# Altium PCB main.PcbDoc (part 1 of 2)
Units mm, origin at the board's own origin, x right, y up, seen from the top; angles counter-clockwise.
Board outline 183.51 x 49.02 mm, 2 copper layers (Top Layer, Bottom Layer); 89 components, 67 nets, 308 pads, 66 vias.
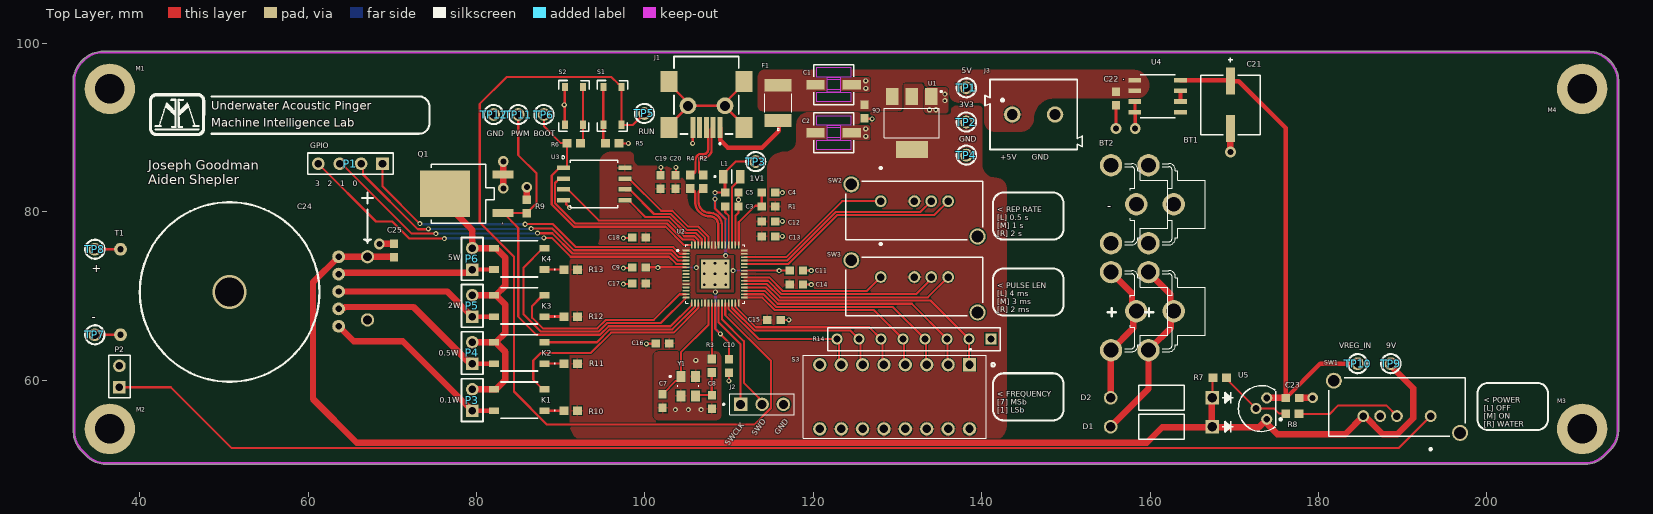
[diagram p0: Top Layer view]
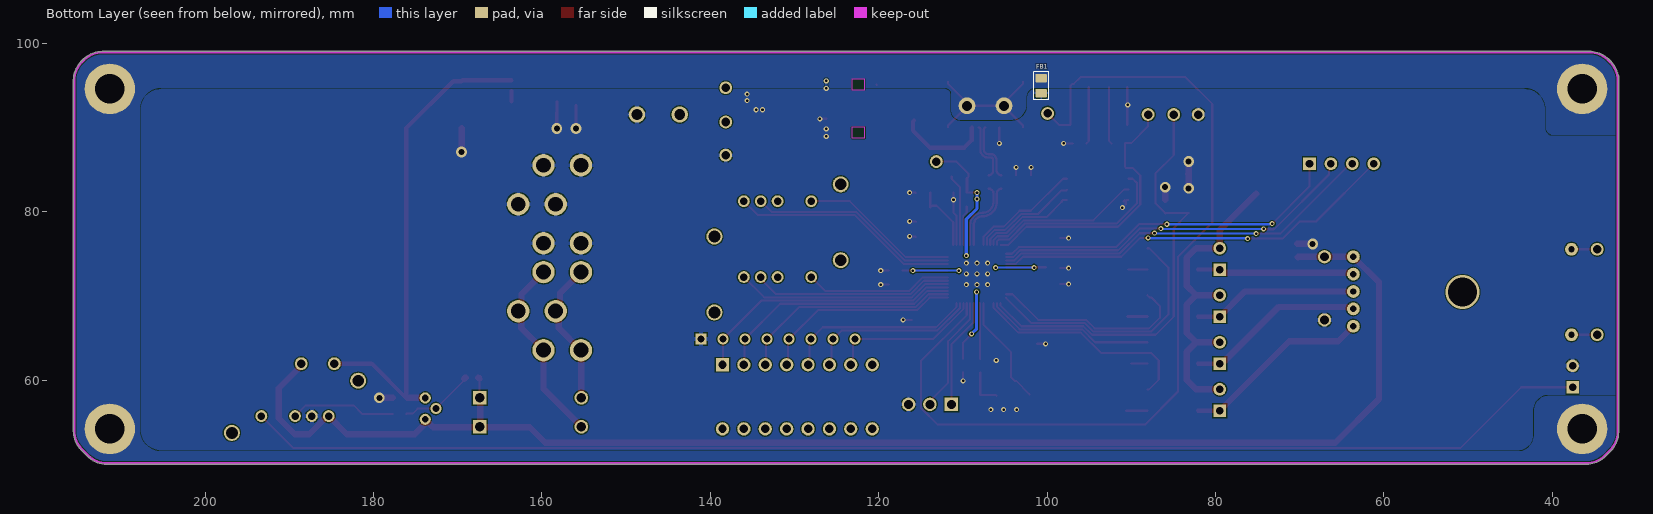
[diagram p1: Bottom Layer view, seen from below]

## Layer stack, top to bottom
Top Solder: solder mask 0.0102, Solder Resist, Dk 3.5
Top Layer: signal copper 0.0356
Dielectric 1: dielectric 0.32, FR-4, Dk 4.8
Bottom Layer: signal copper 0.0356
Bottom Solder: solder mask 0.0102, Solder Resist, Dk 3.5

## Board outline
33.067,51.591 cw(c35.324,53.848) 32.133,53.848 32.133,96.139 cw(c32.258,96.139) 32.192,96.246 cw(c35.324,95.631) 33.067,97.888 33.068,97.888 33.303,98.123 33.303,98.124 cw(c35.56,95.867) 35.402,99.054 35.433,99.058 35.562,99.058 212.217,99.058 cw(c212.217,95.867) 214.474,98.124 214.71,97.888 cw(c212.453,95.631) 215.644,95.631 215.644,95.63 215.644,53.975 cw(c212.453,53.975) 214.71,51.718 213.966,50.974 cw(c211.709,53.231) 211.709,50.04 35.941,50.04 cw(c35.941,53.231) 33.684,50.974

## Design rules (kind name [scope] priority, off if disabled: settings)
Clearance [All] p1: gap=0.125 ignorepadtopadclearanceinfootprint=FALSE
ComponentClearance ComponentClearance_1 [InComponent('C24')] p1: gap=-0.025 collisioncheckmode=3 verticalgap=-0.025 showdistances=FALSE
ComponentClearance [All] p2: gap=0.254 collisioncheckmode=3 verticalgap=0.254 showdistances=FALSE
DiffPairsRouting DiffPairsRouting_USB [InDifferentialPair('D')] p1: maxlimit=0.127 minlimit=0.127 mostfreqgap=0.127 toplayer_minwidth=0.277 toplayer_maxwidth=0.277 toplayer_prefwidth=0.277 bottomlayer_minwidth=0.277 bottomlayer_maxwidth=0.277 bottomlayer_prefwidth=0.277 impedanceprofiledriven=TRUE impedanceprofileid={1446AEBD-7155-41AE-8382-F6E25852DD7B} impedanceprofilevalue=90.000000 maxuncoupledlength=12.7
DiffPairsRouting DiffPairsRouting_USB_X [InDifferentialPair('DX')] p2: maxlimit=0.127 minlimit=0.127 mostfreqgap=0.127 toplayer_minwidth=0.277 toplayer_maxwidth=0.277 toplayer_prefwidth=0.277 bottomlayer_minwidth=0.277 bottomlayer_maxwidth=0.277 bottomlayer_prefwidth=0.277 impedanceprofiledriven=TRUE impedanceprofileid={1446AEBD-7155-41AE-8382-F6E25852DD7B} impedanceprofilevalue=90.000000 maxuncoupledlength=12.7
DiffPairsRouting DiffPairsRouting_RS485 [InDifferentialPair('RS485')] p3: maxlimit=0.305 minlimit=0.127 mostfreqgap=0.254 toplayer_minwidth=0.099 toplayer_maxwidth=0.205 toplayer_prefwidth=0.205 bottomlayer_minwidth=0.099 bottomlayer_maxwidth=0.205 bottomlayer_prefwidth=0.205 maxuncoupledlength=12.7
DiffPairsRouting DiffPairsRouting_RS485_X [InDifferentialPair('RS485X')] p4: maxlimit=0.305 minlimit=0.127 mostfreqgap=0.254 toplayer_minwidth=0.099 toplayer_maxwidth=0.205 toplayer_prefwidth=0.205 bottomlayer_minwidth=0.099 bottomlayer_maxwidth=0.205 bottomlayer_prefwidth=0.205 maxuncoupledlength=12.7
Height [All] p1: minheight=0 maxheight=50.8 prefheight=12.7
HoleSize [All] p1: absolutevalues=TRUE maxlimit=5.08 minlimit=0.025 maxpercent=80.000 minpercent=20.000
MinimumSolderMaskSliver [All] p1: minsoldermaskwidth=0.102
PolygonConnect Polygon_Cap_GND [IsNamedPolygon('T.5V') or IsNamedPolygon('T.5V') or IsNamedPolygon('T.GND-2')] p1: thpad.connectstyle=Relief thpad.reliefconductorwidth=0.254 thpad.reliefentries=4 thpad.polygonreliefangle="90 Angle" thpad.airgapwidth=0.125 smdpad.connectstyle=Direct smdpad.reliefconductorwidth=0.254 smdpad.reliefentries=4 smdpad.polygonreliefangle="90 Angle" smdpad.airgapwidth=0.125 via.connectstyle=Direct via.reliefconductorwidth=0.254 via.reliefentries=4 via.polygonreliefangle="90 Angle" via.airgapwidth=0.125
PolygonConnect Polygon_GND_Connect [IsNamedPolygon('B.GND')] p2: thpad.connectstyle=Relief thpad.reliefconductorwidth=0.508 thpad.reliefentries=4 thpad.polygonreliefangle="90 Angle" thpad.airgapwidth=0.125 smdpad.connectstyle=Relief smdpad.reliefconductorwidth=0.254 smdpad.reliefentries=4 smdpad.polygonreliefangle="90 Angle" smdpad.airgapwidth=0.125 via.connectstyle=Direct via.reliefconductorwidth=0.254 via.reliefentries=4 via.polygonreliefangle="90 Angle" via.airgapwidth=0.125
PolygonConnect Polygon_3V3-2/GND-12/1V1-1_Connect_Relief90 [IsNamedPolygon('T.1V1-1') or IsNamedPolygon('T.GND-1') or IsNamedPolygon('B.GND-1') or IsNamedPolygon('T.5V') vs (IsThruPin or IsSMTPin or IsPad or IsComponentPad or IsVia)] p3: thpad.connectstyle=Relief thpad.reliefconductorwidth=0.254 thpad.reliefentries=4 thpad.polygonreliefangle="90 Angle" thpad.airgapwidth=0.125 smdpad.connectstyle=Relief smdpad.reliefconductorwidth=0.254 smdpad.reliefentries=4 smdpad.polygonreliefangle="90 Angle" smdpad.airgapwidth=0.125 via.connectstyle=Direct via.reliefconductorwidth=0.254 via.reliefentries=4 via.polygonreliefangle="90 Angle" via.airgapwidth=0.125
PolygonConnect Polygon_5V [IsNamedPolygon('T.5V') vs (IsThruPin or IsSMTPin or IsPad or IsComponentPad or IsVia)] p4: thpad.connectstyle=Relief thpad.reliefconductorwidth=0.508 thpad.reliefentries=4 thpad.polygonreliefangle="90 Angle" thpad.airgapwidth=0.125 smdpad.connectstyle=Relief smdpad.reliefconductorwidth=0.508 smdpad.reliefentries=4 smdpad.polygonreliefangle="90 Angle" smdpad.airgapwidth=0.125 via.connectstyle=Direct via.reliefconductorwidth=0.254 via.reliefentries=4 via.polygonreliefangle="90 Angle" via.airgapwidth=0.125
PolygonConnect Polygon_3V3-3_Connect [IsNamedPolygon('T.3V3-3') vs (IsThruPin or IsSMTPin or IsPad or IsComponentPad or IsVia)] p5: thpad.connectstyle=Relief thpad.reliefconductorwidth=0.254 thpad.reliefentries=4 thpad.polygonreliefangle="90 Angle" thpad.airgapwidth=0.125 smdpad.connectstyle=Relief smdpad.reliefconductorwidth=0.254 smdpad.reliefentries=4 smdpad.polygonreliefangle="90 Angle" smdpad.airgapwidth=0.125 via.connectstyle=Direct via.reliefconductorwidth=0.254 via.reliefentries=4 via.polygonreliefangle="90 Angle" via.airgapwidth=0.125
PolygonConnect Polygon_3V3-1_Connect_Direct [IsNamedPolygon('T.3V3-1')] p6: connectstyle=Direct reliefconductorwidth=0.254 reliefentries=4 polygonreliefangle="90 Angle" airgapwidth=0.254
PolygonConnect Polygon_3V3-2_Connect [IsNamedPolygon('T.5V')] p7: thpad.connectstyle=Relief thpad.reliefconductorwidth=0.254 thpad.reliefentries=4 thpad.polygonreliefangle="90 Angle" thpad.airgapwidth=0.254 smdpad.connectstyle=Relief smdpad.reliefconductorwidth=0.254 smdpad.reliefentries=4 smdpad.polygonreliefangle="90 Angle" smdpad.airgapwidth=0.254 via.connectstyle=Direct via.reliefconductorwidth=0.254 via.reliefentries=4 via.polygonreliefangle="90 Angle" via.airgapwidth=0.254
PolygonConnect PolygonConnect_1V1 [IsNamedPolygon('T.1V1-1')] p8: connectstyle=Direct reliefconductorwidth=0.254 reliefentries=4 polygonreliefangle="90 Angle" airgapwidth=0.254
PolygonConnect Polygon_EARTH_Direct_Connect [IsNamedPolygon('B.EARTH')] p9: connectstyle=Direct reliefconductorwidth=0.508 reliefentries=4 polygonreliefangle="90 Angle" airgapwidth=0.254
PolygonConnect [All] p10: connectstyle=Relief reliefconductorwidth=0.254 reliefentries=4 polygonreliefangle="90 Angle" airgapwidth=0.254
RoutingVias [All] p1: holewidth=0.711 width=1.27 viastyle="Through Hole" minholewidth=0.15 minwidth=0.4 maxholewidth=0.711 maxwidth=1.27
SolderMaskExpansion [All] p1: expansion=0.102 istentingtop=FALSE
SupplyNets "Schematic Supply Nets_6" [InNet('9V')] p1: voltage=0.000
SupplyNets "Schematic Supply Nets_5" [InNet('EARTH')] p2: voltage=0.000
SupplyNets "Schematic Supply Nets_3" [InNet('1V1')] p3: voltage=0.000
SupplyNets "Schematic Supply Nets_2" [InNet('3V3')] p4: voltage=0.000
SupplyNets "Schematic Supply Nets_1" [InNet('GND')] p5: voltage=0.000
SupplyNets "Schematic Supply Nets" [InNet('5V')] p6: voltage=0.000
Width [All] p1: maxlimit=2.54 minlimit=0.2 preferedwidth=0.254
25 further rules are at their usual default settings.

## Classes and differential pairs
component class waveform-output: BT1 BT2 C21 C22 C23 C24 C25 D1 D2 J3 K1 K2 K3 K4 P2 P3 P4 P5 P6 Q1 R7 R8 R9 R10 R11 R12 R13 R14 S3 SW1 SW2 SW3 T1 TP7 TP8 TP9 TP10 TP11 TP12 U4 U5
component class rp2350: B C1 C2 C3 C4 C5 C6 C7 C8 C9 C10 C11 C12 C13 C14 C15 C16 C17 C18 C19 C20 F1 FB1 J1 J2 L1 M1 M2 M3 M4 P1 R1 R2 R3 R4 R5 R6 S1 S2 TP1 TP2 TP3 TP4 TP5 TP6 U1 U2 U3 Y1
differential pair DX: +DX_P -DX_N
differential pair D: +D_P -D_N

## Components (designator, comment, footprint, x,y, rotation, side; value= is the part's Value field where it differs from the comment)
BT1 "593_594" BAT_593 162.814,68.212 r90 top
BT2 "593_594" BAT_593 158.369,68.212 r90 top
C1 "10uF" RADIAL_CAN_CAP_4_X_5.8_SMD 122.428,95.123 r0 top
C2 "10uF" RADIAL_CAN_CAP_4_X_5.8_SMD 122.428,89.408 r0 top
C3 "Cap" CAPC0603 110.325,80.645 r0 top value=4.7uF
C4 "Cap" CAPC0603 114.681,82.296 r0 top value=4.7uF
C5 "Cap" CAPC0603 110.325,82.296 r0 top value=4.7uF
C6 "Cap" CAPC0603 126.111,91.948 r90 top value=100nF
C7 "Cap" CAPC0603 102.108,57.531 r270 top value=15pF
C8 "Cap" CAPC0603 107.95,57.442 r270 top value=15pF
C9 "Cap" CAPC0603 99.314,73.406 r180 top value=100nF
C10 "Cap" CAPC0603 109.982,61.722 r270 top value=4.7uF
C11 "Cap" CAPC0603 117.983,73.025 r0 top value=100nF
C12 "Cap" CAPC0603 114.681,78.867 r0 top value=100nF
C13 "Cap" CAPC0603 114.681,77.089 r0 top value=100nF
C14 "Cap" CAPC0603 117.983,71.374 r0 top value=100nF
C15 "Cap" CAPC0603 115.316,67.183 r0 top value=100nF
C16 "Cap" CAPC0603 102.108,64.389 r180 top value=100nF
C17 "Cap" CAPC0603 99.314,71.501 r180 top value=100nF
C18 "Cap" CAPC0603 99.314,76.962 r180 top value=100nF
C19 "Cap" CAPC0603 101.854,83.566 r90 top value=100nF
C20 "Cap" CAPC0603 103.632,83.566 r90 top value=100nF
C21 "100uF" CAP_SMT_RADIAL_W6.6MM_D6.3MM 169.545,92.723 r270 top
C22 "Tantalum" CAPC0603 155.956,93.472 r90 top value=10uF
C23 "Cap" CAPC0603 176.911,57.912 r0 top value=100nF
C24 "6800uF" CAP_TH_RADIAL_W18MM_D7.5MM 67.056,74.676 r270 top
C25 "Cap" CAPC0603 70.231,75.438 r90 top value=100nF
D1 "1N4003" CR_1N4005_ONS 167.401,54.483 r180 top
D2 "1N4003" CR_1N4005_ONS 167.401,57.925 r180 top
F1 "MF-MSMF050-2" FUSM4632X85 115.824,92.964 r90 top
FB1 "0805" L0805 100.711,94.996 r270 bottom
J1 "[USB]Mini-B-USB" SAMTEC_MUSB-05-X-B-SM-A-R-K-TR 107.315,93.853 r180 top
J2 "[Connector] 1x3-header-2.54mm pitch" 1x3-2.54MM-MALE-HEADER 113.919,57.15 r0 top
J3 "[Connector] 691213510002" "[CONNECTOR] 5MM_2PORT_SCREW" 146.177,91.567 r0 top
K1 "AQY282SZ" AQY282SZ 85.09,57.658 r90 top
K2 "AQY282SZ" AQY282SZ 85.09,63.246 r90 top
K3 "AQY282SZ" AQY282SZ 85.09,68.834 r90 top
K4 "AQY282SZ" AQY282SZ 85.09,74.422 r90 top
L1 "3.3uH" 2016_SMD_Inductor 110.325,84.201 r0 top
M1 "M3 Mount Hole" 3.5MM-MOUNTING-HOLE 36.449,94.615 r0 top
M2 "M3 Mount Hole" 3.5MM-MOUNTING-HOLE 36.449,54.229 r0 top
M3 "M3 Mount Hole" 3.5MM-MOUNTING-HOLE 211.328,54.229 r0 top
M4 "M3 Mount Hole" 3.5MM-MOUNTING-HOLE 211.328,94.615 r0 top
P1 "Header 4" HDR1X4 68.834,85.725 r180 top
P2 "water detector" HDR1X2 37.592,59.182 r90 top
P3 "0.1W" HDR1X2 79.502,56.388 r90 top
P4 "0.5W" HDR1X2 79.502,61.976 r90 top
P5 "2W" HDR1X2 79.502,67.564 r90 top
P6 "5W" HDR1X2 79.502,73.152 r90 top
Q1 "NMOS" TO-252AA 77.851,82.169 r90 top
R1 "Res" RES0603 114.681,80.645 r180 top value=33
R2 "Res" RES0603 106.934,83.566 r270 top value=27
R3 "Res" RES0603 107.95,61.722 r90 top value=1k
R4 "Res" RES0603 105.41,83.566 r270 top value=27
R5 "Res" RES0603 96.139,88.138 r180 top value=1k
R6 "Res" RES0603 91.567,88.138 r180 top value=1k
R7 "Res" RES0603 168.275,60.325 r180 top value=10Meg
R8 "Res" RES0603 176.911,56.007 r0 top value=10k
R9 "Res" RES0603 85.979,80.645 r90 top value=1Meg
R10 "Res" RES0603 91.186,56.388 r0 top value=330
R11 "Res" RES0603 91.186,61.976 r0 top value=330
R12 "Res" RES0603 91.186,67.564 r0 top value=330
R13 "Res" RES0603 91.186,73.152 r0 top value=330
R14 "4608X-101-105LF" BO_4608X 141.122,64.897 r180 top
S1 "[SPST] SMD Pushbutton" "[SPST] SMD Pushbutton" 96.139,92.583 r90 top
S2 "[SPST] SMD Pushbutton" "[SPST] SMD Pushbutton" 91.567,92.583 r90 top
S3 "DS01C-254-L-08BE" SW_DS01C-254-L-08BE 129.667,58.039 r180 top
SW1 "1825255-8" MHS-133_TEC 193.325,55.753 r270 top
SW2 "1825255-8" MHS-133_TEC 128.016,81.28 r90 top
SW3 "1825255-8" MHS-133_TEC 128.016,72.263 r90 top
T1 "multi_tap_transformer" multi_tap_transformer 50.673,70.485 r270 top
TP1 "TP" TPTH-100mil 138.176,94.742 r0 top
TP2 "TP" TPTH-100mil 138.176,90.678 r0 top
TP3 "TP" TPTH-100mil 113.157,85.979 r0 top
TP4 "TP" TPTH-100mil 138.176,86.741 r0 top
TP5 "TP" TPTH-100mil 99.949,91.694 r0 top
TP6 "TP" TPTH-100mil 88.011,91.567 r0 top
TP7 "TP" TPTH-100mil 34.671,65.405 r0 top
TP8 "TP" TPTH-100mil 34.671,75.565 r0 top
TP9 "TP" TPTH-100mil 188.595,61.976 r0 top
TP10 "TP" TPTH-100mil 184.658,61.976 r90 top
TP11 "TP" TPTH-100mil 84.963,91.567 r90 top
TP12 "TP" TPTH-100mil 82.042,91.567 r90 top
U1 "NCP1117LPST33T3G" SOT230P700X175-4N 131.699,90.551 r270 top
U2 "[MCU] RP2350" QFN40P700X700X90-61N 108.352,72.625 r0 top
U3 "W25Q128JVSIQ TR" SOIC-8-W-208MIL-2 93.98,83.312 r0 top
U4 "LP2951ACDR2G" SOIC8-3.9MM 160.909,93.739 r0 top
U5 "PMOS" TO-92 173.863,55.372 r90 top
Y1 "ABM8-272-T3" XTAL_ABM8-272-T3 105.156,59.309 r0 top

## Footprints (in the part's own frame and the unit in brackets; to place one, negate y for a bottom-side part, rotate by r counter-clockwise, add the part's x,y. Pads: shape width x height; smd on the part's side, far side on the other; paste and mask are expansions set on the pad)
1x3-2.54MM-MALE-HEADER [mm]
  rect 1.605x1.605 hole 1.07: 1(-2.54,0)
  round 1.605 hole 1.07: 2(0,0) 3(2.54,0)
  silkscreen extent -4.66,-1.25 3.81,1.25, body extent -3.81,-1.25 3.81,1.25, height 8.95
3.5MM-MOUNTING-HOLE [mm]
  round 6 hole 3.5: 1(0,0)
2016_SMD_Inductor [mm] "0806 (2016 Metric)"
  rect 1x1.6 smd: 1(-1,0) 2(1,0)
  silkscreen extent -2.1,-0.8 0,0.8, body extent -1,-0.8 1,0.8, height 0.95
"[CONNECTOR] 5MM_2PORT_SCREW" [mm] "5.08 mm pitch 2 port screw terminal / 691213510002"
  round 1.95 hole 1.3: 1(-2.54,0) 2(2.54,0)
  silkscreen extent -5.78,-4.15 5.78,4.15, body extent -5.68,-4.04 5.68,4.06, height 10
"[SPST] SMD Pushbutton" [mm] "PTS815SJM250SMTRLFS"
  rect 1x0.7 smd: 1(-2.25,1.075) 1(2.25,1.075) 2(-2.25,-1.075) 2(2.25,-1.075)
  silkscreen extent -3.02,-1.82 3.02,1.8, body extent -2.25,-1.6 2.25,1.6, height 2.5
AQY282SZ [mm]
  rect 0.8x1.2 smd: 1(-1.27,-3) 2(1.27,-3) 3(1.27,3) 4(-1.27,3)
  silkscreen extent -2.15,-4.25 2.15,2.2, body extent -2.35,-3.4 2.35,3.4, height 1.7
BAT_593 [mm]
  round 2.655 hole 1.77: 1(-4.635,3) 1(0,0) 1(4.635,3) 2(8.065,3) 2(12.7,0) 2(17.335,3)
  silkscreen extent -4.83,-3.75 17.52,3.43, body extent -4.7,-3.56 17.65,3.96, height 14.2
BO_4608X [mil]
  rect 52x52 hole 32 paste-99999 mask+0: 1(0,0)
  round 52 hole 32 paste-99999 mask+0: 2(103,0) 3(206,0) 4(309,0) 5(412,0) 6(515,0) 7(618,0) 8(721,0)
  silkscreen extent -44,-54 764,54, body extent -39,-49 759,49, height 200
CAP_SMT_RADIAL_W6.6MM_D6.3MM [mil]
  rect 126x42 smd paste+0 mask+0: 1(-110.5,0) 2(110.5,0)
  silkscreen extent -220,-139 139,139, body extent -154,-134 154,134, height 317
CAP_TH_RADIAL_W18MM_D7.5MM [mil]
  round 62 hole 42 paste-99999 mask+0: 1(0,0) 2(295.28,0)
  silkscreen extent -302,-25 -252,25, body extent -207,-354 503,354, height 1458
CAPC0603 [mm] "Chip Capacitor, 2-Leads, Body 1.60x0.80mm, IPC Medium Density"
  rect 1x0.95 smd: 1(-0.8,0) 2(0.8,0)
  body extent -0.88,-0.48 0.87,0.48, height 0.8
CR_1N4005_ONS [mil]
  rect 64x64 / inner round 60 / far side rect 64x64 hole 44 paste-99999 mask+0: 1(0,0)
  round 64 / inner round 60 / far side round 64 hole 44 paste-99999 mask+0: 2(475.59,0)
  silkscreen extent -97,-58 345,59, body extent -17,-53 493,53, height 107
FUSM4632X85 [mm]
  rect 1.5x3.2 smd: 1(-2.1,0) 2(2.1,0)
  silkscreen extent -3.3,-1.6 1.1,1.6, body extent -2.27,-1.62 2.27,1.62, height 1.1
HDR1X2 [mm] "Connector; Header; 2 Position"
  rect 1.5x1.5 hole 0.9: 1(0,0)
  round 1.5 hole 0.9: 2(2.54,0)
  silkscreen extent -1.27,-1.27 3.81,1.27
HDR1X4 [mm] "Connector; Header; 4 Position"
  rect 1.5x1.5 hole 0.9: 1(0,0)
  round 1.5 hole 0.9: 2(2.54,0) 3(5.08,0) 4(7.62,0)
  silkscreen extent -1.27,-1.27 8.89,1.27
L0805 [mil]
  rrect25% 40x55 smd: 1(-35,0) 2(35,0)
  silkscreen extent -65,-35 65,35, body extent -39,-24 39,24, height 43
MHS-133_TEC [mil]
  round 55 / inner round 60 / far side round 55 hole 35 paste-99999 mask+0: 1(0,0) 2(0,-157.48) 3(0,-236.22) 4(0,-314.96)
  round 75 / inner round 60 / far side round 75 hole 55 paste-99999 mask+0: 5(-165.35,-452.76) 6(78.74,137.8)
  silkscreen extent -180,-477 160,163, body extent -175,-475 89,155, height 694
multi_tap_transformer [mil]
  round 60 hole 30: 1(-165,510) 2(-83.75,510) 3(-2.5,510) 4(78.75,510) 5(160,510) 6(-200,-510) 7(200,-510)
QFN40P700X700X90-61N [mm] "RP2350"
  rrect25% 0.81x0.2 smd paste+0 mask+0.102: 1(-3.45,2.8) 2(-3.45,2.4) 3(-3.45,2) 4(-3.45,1.6) 5(-3.45,1.2) 6(-3.45,0.8) 7(-3.45,0.4) 8(-3.45,0) 9(-3.45,-0.4) 10(-3.45,-0.8) 11(-3.45,-1.2) 12(-3.45,-1.6) 13(-3.45,-2) 14(-3.45,-2.4) 15(-3.45,-2.8) 31(3.45,-2.8) 32(3.45,-2.4) 33(3.45,-2) 34(3.45,-1.6) 35(3.45,-1.2) 36(3.45,-0.8) 37(3.45,-0.4) 38(3.45,0) 39(3.45,0.4) 40(3.45,0.8) 41(3.45,1.2) 42(3.45,1.6) 43(3.45,2) 44(3.45,2.4) 45(3.45,2.8)
  rrect25% 0.2x0.81 smd paste+0 mask+0.102: 16(-2.8,-3.45) 17(-2.4,-3.45) 18(-2,-3.45) 19(-1.6,-3.45) 20(-1.2,-3.45) 21(-0.8,-3.45) 22(-0.4,-3.45) 23(0,-3.45) 24(0.4,-3.45) 25(0.8,-3.45) 26(1.2,-3.45) 27(1.6,-3.45) 28(2,-3.45) 29(2.4,-3.45) 30(2.8,-3.45) 46(2.8,3.45) 47(2.4,3.45) 48(2,3.45) 49(1.6,3.45) 50(1.2,3.45) 51(0.8,3.45) 52(0.4,3.45) 53(0,3.45) 54(-0.4,3.45) 55(-0.8,3.45) 56(-1.2,3.45) 57(-1.6,3.45) 58(-2,3.45) 59(-2.4,3.45) 60(-2.8,3.45)
  rect 3.4x3.4 smd paste-0.62 mask+0.102: 61(0,0)
  silkscreen extent -4.56,-3.5 3.5,3.5, body extent -3.55,-3.55 3.55,3.55, height 0.96
RADIAL_CAN_CAP_4_X_5.8_SMD [mil]
  rect 86x45 smd paste+0 mask+0: 1(-85,0) 2(85,0)
  Top Layer keep-out region: -80,35 -80,80 80,80 80,35
  Top Layer keep-out region: -80,-80 -80,-35 80,-35 80,-80
  Top Layer keep-out region: -30,-35 -30,35 30,35 30,-35
  Keep-Out Layer region: -30,-24.5 -30,24.5 30,24.5 30,-24.5
  silkscreen extent -94,-94 94,94, body extent -108,-89 108,89, height 242
RES0603 [mm] "Chip Resistor, 2-Leads, Body 1.60x0.80mm, IPC Medium Density"
  rect 1.05x1 smd: 1(-0.8,0) 2(0.8,0)
  body extent -0.88,-0.48 0.87,0.47, height 0.8
SAMTEC_MUSB-05-X-B-SM-A-R-K-TR [mm]
  rect 0.6x2.5 smd: 1(-1.6,3.83) 2(-0.8,3.83) 3(0,3.83) 4(0.8,3.83) 5(1.6,3.83)
  rect 2x2.5 smd: SH(-4.45,3.83) SH(-4.45,-1.62) SH(4.45,3.83) SH(4.45,-1.62)
  round 2 hole 1.2: SH(-2.2,1.25) SH(2.2,1.25)
  silkscreen extent -3.85,-4.6 3.85,5.85, body extent -5,-4.6 5,4.9, height 4.13
SOIC8-3.9MM [mil]
  rect 59x22 smd paste+0 mask+0: 1(-106.5,75) 2(-106.5,25) 3(-106.5,-25) 4(-106.5,-75) 5(106.5,-75) 6(106.5,-25) 7(106.5,25) 8(106.5,75)
  silkscreen extent -82,-102 82,102, body extent -122,-96 122,96, height 69
SOIC-8-W-208MIL-2 [mil] "208mil x 150mil SOIC-8 package"
  rect 60x21 smd paste+0 mask+0: 1(-143.5,75) 2(-143.5,25) 3(-143.5,-25) 4(-143.5,-75) 5(143.5,-75) 6(143.5,-25) 7(143.5,25) 8(143.5,75)
  silkscreen extent -152,-111 111,132, body extent -159,-106 159,106, height 85
SOT230P700X175-4N [mm]
  rect 2x1.5 smd: 1(-3.15,2.3) 2(-3.15,0) 3(-3.15,-2.3)
  rect 2x3.8 smd: 4(3.15,0)
  silkscreen extent -3.85,-3.25 1.75,3.6, body extent -3.5,-3.25 3.5,3.25, height 1.8
SW_DS01C-254-L-08BE [mm]
  rect 1.58x1.58 / inner round 1.58 / far side rect 1.58x1.58 hole 1: 1A(-8.89,-3.81)
  round 1.58 hole 1: 1B(-8.89,3.81) 2A(-6.35,-3.81) 2B(-6.35,3.81) 3A(-3.81,-3.81) 3B(-3.81,3.81) 4A(-1.27,-3.81) 4B(-1.27,3.81) 5A(1.27,-3.81) 5B(1.27,3.81) 6A(3.81,-3.81) 6B(3.81,3.81) 7A(6.35,-3.81) 7B(6.35,3.81) 8A(8.89,-3.81) 8B(8.89,3.81)
  silkscreen extent -10.87,-5.7 10.87,4.95, body extent -10.87,-4.95 10.87,4.95, height 5.18
TO-92 [mil]
  round 52 hole 32 paste-99999 mask+0: 1(0,0) 2(50,50) 3(100,0)
  silkscreen extent -57,-70 158,132, body extent -52,-17 152,127, height 210
TO-252AA [mil]
  rect 37x98 smd paste+0 mask+0: 1(-90,-209.5) 3(90,-209.5)
  rect 217x233 smd paste+0 mask+0: 2(0,63)
  silkscreen extent -138,-168 138,128, body extent -133,-244 133,166, height 94
TPTH-100mil [mil] "Test Point"
  round 60 hole 40: 1(0,0)
  silkscreen extent -45,-45 45,45, body extent -50,-50 50,50, height 182
XTAL_ABM8-272-T3 [mm]
  rect 1.05x1.3 smd: 1(-0.875,1.15) 2(-0.875,-1.15) 3(0.875,-1.15) 4(0.875,1.15)
  silkscreen extent -2.24,-0.09 1.25,1.25, body extent -1.25,-1.6 1.25,1.6, height 0.7

## Part data
BT1 BT2: "Battery Contact Snap (Negative) 9V Cell PC Pin", Package=None, Availability=Unavailable, MF="Keystone Electronics", MP=593, Price=None
C1 C2: library part EEE-FK1E100R, "10uF electrolytic cap, radial can, SMD", Manufacturer_Name=Panasonic, Copyright="Copyright (C) 2025 Ultra Librarian. All rights reserved.", Manufacturer_Part_Number=EEE-FK1E100R
C3 C4 C5 C6 C7 C8 C9 C10 C11 C12 C13 C14 C15 C16 C17 C18 C19 C20 C23 C25: Supplier Part Number 1=1276-1000-1-ND, Supplier 1=Digi-Key
C21: library part EXV107M025A9HAA, "100 µF 25 V Aluminum Electrolytic Capacitors Radial, Can - SMD 340mOhm @ 100kHz 3000 Hrs @ 105°C", Manufacturer_Name=Kemet, Copyright="Copyright (C) 2026 Ultra Librarian. All rights reserved.", Manufacturer_Part_Number=EXV107M025A9HAA
C22: library part Cap, Supplier Part Number 1=1276-1000-1-ND, Supplier 1=Digi-Key
C24: library part UKL1A682KHD, "6800 µF 10 V Aluminum Electrolytic Capacitors Radial, Can 2000 Hrs @ 85°C", Manufacturer_Name=Nichicon, Copyright="Copyright (C) 2026 Ultra Librarian. All rights reserved.", Digi-Key_Part_Number_1=UKL1A682KHD-ND, Manufacturer_Part_Number=UKL1A682KHD
D1 D2: "Diode 200 V 1A Through Hole DO-41", Manufacturer_Name=onsemi, Copyright="Copyright (C) 2025 Ultra Librarian. All rights reserved.", Manufacturer_Part_Number=1N4003
F1: "[Fuse] Polymeric PTC Resettable Fuse 15V 500 mA Ih Surface Mount 1812 (4532 Metric), Concave", Package="1812 Bourns", Availability="In Stock", Check_prices=https://www.snapeda.com/parts/MF-MSMF050-2/Bourns+-+J.W.+Miller/view-part/?ref=eda, MF=Bourns, MP=MF-MSMF050-2, Price=None, Purchase-URL=https://pricing.snapeda.com/search/part/MF-MSMF050-2/?ref=eda, SnapEDA_Link=https://www.snapeda.com/parts/MF-MSMF050-2/Bourns+-+J.W.+Miller/view-part/?ref=snap
FB1: library part MH2029-300Y, "[Inductor] Ferrite Bead Bourns MH2029-300Y / SMD-FERRITE-BEAD-30R-3A(0805)", Package="0805 Bourns", Check_prices=https://www.snapeda.com/parts/MH2029-300Y/Bourns/view-part/?ref=eda, MF=Bourns, MP=MH2029-300Y, SnapEDA_Link=https://www.snapeda.com/parts/MH2029-300Y/Bourns/view-part/?ref=snap
J1: "USB - mini B USB 2.0 Receptacle Connector 5 Position Surface Mount, Right Angle / MUSB-05-X-B-SM-A-R-K-TR", Package=None, Check_prices=https://www.snapeda.com/parts/MUSB-05-F-B-SM-A-R-K-TR/Samtec/view-part/?ref=eda, MF=Samtec, MP=MUSB-05-F-B-SM-A-R-K-TR, SnapEDA_Link=https://www.snapeda.com/parts/MUSB-05-F-B-SM-A-R-K-TR/Samtec/view-part/?ref=snap
J2: "1x3 2.54mm header", Package=None, Availability="In Stock", Check_prices=https://www.snapeda.com/parts/G800W305018EU/NEC/view-part/?ref=eda, MF="FCI Connectors", MP=G800W305018EU, Price=None, SnapEDA_Link=https://www.snapeda.com/parts/G800W305018EU/NEC/view-part/?ref=snap
J3: "2 Position Wire to Board Terminal Block Horizontal with Board 0.200 (5.08mm) Through Hole", Package=None, Check_prices=https://www.snapeda.com/parts/691213510002/W%25C3%25BCrth+Elektronik+Midcom/view-part/?ref=eda, MF="WÃ¼rth Elektronik", MP=691213510002, SnapEDA_Link=https://www.snapeda.com/parts/691213510002/W%25C3%25BCrth+Elektronik+Midcom/view-part/?ref=snap
K1 K2 K3 K4: "Solid State Relays - PCB Mount 60v 500mA SOP Form A Norm-Open", Manufacturer_Name=Panasonic, Mouser Part Number=769-AQY282SZ, Datasheet Link=https://media.digikey.com/pdf/Data%20Sheets/Panasonic%20Electric%20Works%20PDFs/AQY28_S_Spec.pdf, Geometry.Height=2.3mm, Manufacturer_Part_Number=AQY282SZ, Mouser Price/Stock=https://www.mouser.co.uk/ProductDetail/Panasonic-Industrial-Devices/AQY282SZ?qs=2rFUEsTwVNwY5EkJsHQb1w%3D%3D
L1: library part "INDUCTOR 3.3uH", "Power Inductors - SMD IND 3.3uH used for RP2350 VREG", Manufacturer_Name=ABRACON, Manufacturer_Part_Number=AOTA-B201610S3R3-101-T, Mouser Part Number=815-AB201610S3R3101T, Datasheet Link=https://abracon.com/datasheets/AOTA-B201610S3R3-101-T.pdf, Geometry.Height=1mm, Mouser Price/Stock=https://www.mouser.co.uk/ProductDetail/ABRACON/AOTA-B201610S3R3-101-T?qs=%252BXxaIXUDbq0IZvJW%2F2mv4w%3D%3D
M1 M2 M3 M4: library part "[Mount] M3 Mount Hole", "Place at least 4.5mm from board edge. Plated."
P1: "Header, 4-Pin", LatestRevisionDate=17-Jul-2002, LatestRevisionNote="Re-released for DXP Platform.", Publisher="Altium Limited"
P2 P3 P4 P5 P6: library part "Header 2", "Header, 2-Pin", LatestRevisionDate=17-Jul-2002, LatestRevisionNote="Re-released for DXP Platform.", Publisher="Altium Limited"
Q1: library part RFD14N05LSM, "N-Channel 50 V 14A (Tc) 48W (Tc) Surface Mount TO-252AA", Manufacturer_Name=onsemi, Copyright="Copyright (C) 2025 Ultra Librarian. All rights reserved.", Manufacturer_Part_Number=RFD14N05LSM
R1 R2 R3 R4 R5 R6 R7 R8 R9 R10 R11 R12 R13: "SMD, RES0603", Supplier Part Number 1=RMCF0603JT10K0CT-ND, Supplier 1=Digi-Key
R14: "1M Ohm ±2% 200mW Power Per Element Bussed 7 Resistor Network/Array ±100ppm/°C 8-SIP", Manufacturer_Name="Bourns Electronics", Copyright="Copyright (C) 2026 Ultra Librarian. All rights reserved.", Manufacturer_Part_Number=4608X-101-105LF
S1 S2: "PTS815SJM250SMTRLFS", Supplier Part Number 1=CKN12215-6-ND, Supplier 1=DigiKey
S3: "8 Position, Through Hole, 2.54 mm Pitch, Raised Slide Actuator, Convex Bottom, Long Pin, DIP Switch", Package=None, Check_prices=https://www.snapeda.com/parts/DS01C-254-L-08BE/Same+Sky/view-part/?ref=eda, MF="Same Sky", MP=DS01C-254-L-08BE, SnapEDA_Link=https://www.snapeda.com/parts/DS01C-254-L-08BE/Same+Sky/view-part/?ref=snap
SW1 SW2 SW3: "MHS133G04=SP3T SL SW VERT AU", Manufacturer_Name="TE Connectivity", Copyright="Copyright (C) 2025 Ultra Librarian. All rights reserved.", Manufacturer_Part_Number=1825255-8, RefDes=RefDes, Type="Slide Switches"
TP1 TP2 TP3 TP4 TP5 TP6 TP7 TP8 TP9 TP10 TP11 TP12: "Test Point"
U1: "Linear Voltage Regulator IC Positive Fixed 1 Output 1A SOT-223", Package="SOT-223-4 ON Semiconductor", Check_prices=https://www.snapeda.com/parts/NCP1117LPST33T3G/Onsemi/view-part/?ref=eda, MF="ON Semiconductor", MP=NCP1117LPST33T3G, SnapEDA_Link=https://www.snapeda.com/parts/NCP1117LPST33T3G/Onsemi/view-part/?ref=snap
U2: library part SC1509(13), "RP2350A MCU from Raspberry Pi Pico; QFN 60 7x7,", Package=None, Check_prices=https://www.snapeda.com/parts/SC1509-A4/Raspberry+Pi/view-part/?ref=eda, MF="Raspberry Pi", MP=SC1509-A4, SnapEDA_Link=https://www.snapeda.com/parts/SC1509-A4/Raspberry+Pi/view-part/?ref=snap
U3: "IC FLASH 128MBIT SPI/QUAD 8SOIC", Manufacturer_Name=Winbond, Copyright="Copyright (C) 2025 Ultra Librarian. All rights reserved.", Manufacturer_Part_Number="W25Q128JVSIQ TR", RefDes=RefDes, Type=Type
U4: "Linear Voltage Regulator IC Positive Adjustable (Fixed) 1 Output 100mA 8-SOIC", Manufacturer_Name=onsemi, Copyright="Copyright (C) 2026 Ultra Librarian. All rights reserved.", Manufacturer_Part_Number=LP2951ACDR2G, RefDes=RefDes, Type=Type
U5: library part VP0808L-G, "P-Channel 80 V 280mA (Tj) 1W (Tc) Through Hole TO-92-3", Manufacturer_Name=Microchip, Copyright="Copyright (C) 2026 Ultra Librarian. All rights reserved.", Manufacturer_Part_Number=VP0808L-G, RefDes=RefDes, Type=Type
Y1: "12 MHz Â±30ppm Crystal 10pF 50 Ohms 4-SMD, No Lead", Package="NON-STANDARD-4 Abracon", Check_prices=https://www.snapeda.com/parts/ABM8-272-T3/Abracon/view-part/?ref=eda, MF=ABRACON, MP=ABM8-272-T3, SnapEDA_Link=https://www.snapeda.com/parts/ABM8-272-T3/Abracon/view-part/?ref=snap

## Via types
v1: diameter 0.6, hole 0.3, Top Layer to Bottom Layer, tented both sides, 57 vias
v2: diameter 1.27, hole 0.711, Top Layer to Bottom Layer, 8 vias
v3: diameter 4, hole 3.404, Top Layer to Bottom Layer, 1 vias

## Nets (pads, with @x,y where several pads share a name; then routed paths per layer and width w, separated by ;. In a path a pad name is that pad's centre, name@x,y a point inside that pad or via, vN(x,y) a via of type N, cw(c..) or ccw(c..) an arc to the next point about the centre after c; other vN are vias at no path point)
0.1W: K1.4 P3.1 T1.5 | length 22.6
  Top Layer w0.508: P3.1 K1.4
  Top Layer w0.762: T1.5 65.405,64.643 71.247,64.643 79.133,56.757 P3.1
0.5W: K2.4 P4.1 T1.4 | length 21.3
  Top Layer w0.508: P4.1 K2.4
  Top Layer w0.762: T1.4 63.773,68.631 64.312,68.631 64.388,68.707 72.517,68.707 78.879,62.345 79.133,62.345 P4.1
1V1: C5.1 C9.1 C10.1 C11.1 L1.1 TP3.1 U2.6 U2.23 U2.39 U2.50 | length 54.6
  Top Layer w0.203: U2.50 109.552,79.17
  Top Layer w0.254: C9.1 100.133,73.425 U2.6 ; v1(108.331,81.534) 108.331,80.403 109.552,79.182 109.552,79.17 ; v1(108.331,82.296) C5.1 ; U2.23 108.352,66.121 109.982,64.491 C10.1@109.982,62.547 ; L1.1@109.525,84.001 L1.1 109.325,84.501 110.803,85.979 TP3.1 ; U2.39 v1(115.951,73.025) C11.1
  Top Layer w0.381: C5.1 L1.1@109.525,84.001
  Bottom Layer w0.254: v1(101.548,73.391) v1(106.12,73.391) ; v1(110.49,73.025) v1(115.951,73.025)
  Bottom Layer w0.381: v1(108.331,82.296) v1(108.331,81.534) 108.331,80.391 109.601,79.121 v1(109.601,74.803) ; v1(108.372,70.487) 108.372,66.122 v1(108.979,65.515)
2W: K3.4 P5.1 T1.3 | length 20
  Top Layer w0.508: P5.1 K3.4
  Top Layer w0.762: T1.3@63.341,70.549 76.517,70.549 P5.1
3V3: C2.1 C3.1 C12.1 C13.1 C14.1 C15.1 C16.1 C17.1 C18.1 C19.1 C20.1 R1.1 R10.2 R11.2 R12.2 R13.2 S3.1B S3.2B S3.3B S3.4B S3.5B S3.6B S3.7B SW2.2 SW3.2 TP2.1 U1.2 U1.4 U2.1 U2.11 U2.20 U2.30 U2.38 U2.44 U2.45 U2.49 U2.53 U2.54 U3.8 | length 4.7
  Top Layer w0.203: U2.49 109.952,79.532
  Top Layer w0.254: C3.1 109.546,80.624 109.546,79.938 109.952,79.532
5V: C1.1 C6.2 C22.2 F1.2 J3.1 TP1.1 U1.3 U4.1 U4.2 | length 0.1
  Top Layer w0.254: C1.1@120.21,95.064 C1.1
5W: K4.4 P6.1 T1.2 | length 18.8
  Top Layer w0.508: P6.1 K4.4
  Top Layer w0.762: T1.2@63.584,72.363 63.979,72.758 79.108,72.758 P6.1
9V: C24.1 C25.1 D1.1 D2.1 R7.2 SW1.4 T1.1 TP9.1 U5.1 | length 175.2
  Top Layer w0.254: D2.1 R7.2@167.401,59.88
  Top Layer w0.762: C25.1 70.193,74.676 C24.1 T1.1 60.579,71.628 60.579,57.785 65.786,52.578 159.599,52.578 161.46,54.44 D1.1@167.33,54.44 ; D2.1 167.33,57.854 D1.1@167.33,54.44 ; R7.2@167.42,60.206 167.539,60.325 R7.2@167.564,60.325 ; TP9.1@188.722,61.595 191.262,59.055 191.262,55.499 189.357,53.594 187.656,53.594 185.497,55.753 SW1.4 183.166,53.594 175.133,53.594 173.97,54.757 173.97,55.265 U5.1 172.931,54.44 D1.1@167.33,54.44
D_N: J1.2 R2.1 | length 7.1
  Top Layer w0.277: R2.1 cw(c106.934,84.874) 106.426,84.874 106.426,86.21 cw(c106.68,86.21) 106.68,86.464 107.005,86.464 ccw(c107.005,87.376) 107.917,87.376 107.917,89.825 cw(c108.115,89.825) J1.2
D_P: J1.3 R4.1 | length 7.1
  Top Layer w0.277: R4.1 ccw(c105.41,84.978) 106.022,84.978 106.022,86.21 cw(c106.68,86.21) 106.68,86.868 107.005,86.868 ccw(c107.005,87.376) 107.513,87.376 107.513,89.825 ccw(c107.315,89.825) J1.3
DX_N: R2.2 U2.51 | length 8.6
  Top Layer w0.277: R2.2 ccw(c106.934,82.206) 106.374,82.206 106.374,81.205 ccw(c107.696,81.205) 107.696,79.883 cw(c107.696,78.427) 109.152,78.427 U2.51
DX_P: R4.2 U2.52 | length 8.6
  Top Layer w0.277: R4.2 cw(c105.41,82.206) 105.97,82.206 105.97,81.205 ccw(c107.696,81.205) 107.696,79.479 cw(c107.696,78.463) 108.712,78.463 108.712,77.724 ccw(c109.116,77.724) 108.712,77.723 108.712,76.745 108.712,76.743 ccw(c109.116,76.741) 108.712,76.737 108.716,76.459 cw(c108.427,76.455) 108.716,76.455 U2.52@108.716,76.075
EARTH: FB1.1 J1.SH M1.1 M2.1 M3.1 M4.1 | length 19
  Top Layer w0.254: J1.SH@102.865,90.023 102.865,90.273 105.115,92.523 J1.SH@105.115,92.603 ; J1.SH@102.865,95.473 102.865,95.223 105.115,92.973 J1.SH@105.115,92.603 ; J1.SH@111.765,90.023 111.765,90.273 109.515,92.523 J1.SH@109.515,92.603 ; J1.SH@111.765,95.473 111.765,95.223 109.515,92.973 J1.SH@109.515,92.603 ; J1.SH@105.115,92.603 J1.SH@109.515,92.603
FB: U4.6 U4.7 | length 1.3
  Top Layer w0.508: U4.6 U4.7
FREQ_SEL_1: R14.2 S3.1A U2.34 | length 32.3
  Top Layer w0.254: U2.34 114.367,71.025 115.921,69.471 133.932,69.471 R14.2 138.506,61.9 S3.1A
FREQ_SEL_2: R14.3 S3.2A U2.33 | length 29.6
  Top Layer w0.254: U2.33 114.231,70.625 115.764,69.092 131.695,69.092 R14.3 135.953,64.834 135.953,61.912 S3.2A
FREQ_SEL_3: R14.4 S3.3A U2.32 | length 26.8
  Top Layer w0.254: U2.32 114.095,70.225 115.607,68.713 129.458,68.713 R14.4 133.375,64.795 133.375,61.951 S3.3A
FREQ_SEL_4: R14.5 S3.4A U2.31 | length 24.1
  Top Layer w0.254: U2.31 113.959,69.825 115.45,68.334 127.221,68.334 R14.5 130.797,64.757 130.797,61.989 S3.4A
FREQ_SEL_5: R14.6 S3.5A U2.29 | length 22.5
  Top Layer w0.254: U2.29 110.752,68.728 113.186,66.294 126.644,66.294 R14.6 128.219,64.719 128.219,62.027 S3.5A
FREQ_SEL_6: R14.7 S3.6A U2.28 | length 20.4
  Top Layer w0.254: U2.28 110.352,68.592 113.031,65.913 124.409,65.913 R14.7 125.629,64.693 125.629,62.077 S3.6A
FREQ_SEL_7: R14.8 S3.7A U2.27 | length 18.3
  Top Layer w0.254: U2.27 109.952,68.456 113.511,64.897 R14.8 123.013,64.693 123.013,64.265 123.063,64.215 123.063,62.661 123.063,62.103 S3.7A
GND: BT1.2 BT2.2 C1.2 C2.2 C3.2 C4.2 C5.2 C6.1 C7.2 C8.2 C9.2 C10.2 C11.2 C12.2 C13.2 C14.2 C15.2 C16.2 C17.2 C18.2 C19.2 C20.2 C21.2 C22.1 C23.2 C24.2 C25.2 FB1.2 J1.5 J2.3 J3.2 P2.2 Q1.3 R5.1 R9.2 R14.1 S2.1 SW1.3 TP4.1 TP12.1 U1.1 U2.47 U2.61 U3.4 U4.3 U4.4 Y1.2 Y1.4 | length 45.4
  Top Layer w0.203: U2.47 110.752,79.51
  Top Layer w0.254: C25.2 C25.2@70.269,76.2 ; U3.4 90.529,81.407 90.669,81.267 90.669,80.908 v1(91.059,80.518) ; S2.1@90.492,90.333 S2.1@90.492,94.833 ; U3.4@90.765,81.407 U3.4@90.905,81.267 ; R5.1 v1(98.044,88.138) ; v1(97.451,71.424) C17.2@98.437,71.424 ; v1(97.451,73.329) C9.2@98.437,73.329 ; v1(97.451,76.885) C18.2@98.437,76.885 ; v1(100.186,64.339) C16.2@101.171,64.339 ; C19.2@101.904,84.316 v1(101.904,85.302) ; C20.2@103.682,84.316 v1(103.682,85.302) ; v1(105.664,88.138) 105.689,88.163 105.689,89.997 J1.5 ; v1(109.982,59.944) C10.2 C10.2@109.982,60.999 ; 110.752,79.51 111.125,79.883 C3.2 111.121,80.649 v1(111.121,81.446) 111.121,82.292 C5.2 ; C12.2@115.56,78.814 115.613,78.867 v1(116.332,78.867) ; C13.2@115.598,77.036 115.651,77.089 v1(116.332,77.089) ; C4.2@115.598,82.243 115.651,82.296 v1(116.332,82.296) ; C15.2@116.039,67.183 C15.2 v1(117.094,67.183) ; C14.2@118.776,71.374 C14.2 v1(119.761,71.374) ; C11.2 v1(119.761,73.025) ; C6.1@126.238,91.059 v1(127,91.059)
  Top Layer w0.381: v2(155.956,89.916) C22.1 ; U4.3 U4.4 158.242,91.795 v2(158.242,89.916)
  Top Layer w0.762: v2(68.453,76.2) 68.472,76.219 70.25,76.219 C25.2@70.269,76.2 ; v2(83.185,82.804) 83.185,84.366 83.274,84.455 83.185,84.544 v2(83.185,85.979) ; R9.2 v2(85.979,82.931) ; v2(169.545,87.122) C21.2 ; C23.2 v2(179.324,57.912)
  other v1: 103.634,56.507 105.156,56.515 106.68,56.515 106.045,62.357 107.061,71.374 108.331,71.374 109.601,71.374 107.061,72.644 108.331,72.644 109.601,72.644 107.061,73.914 108.331,73.914 109.601,73.914 126.233,88.964 126.233,89.853 133.807,92.137 134.569,92.137 90.424,92.71 135.636,93.218 135.636,93.98 126.233,94.679 126.233,95.568
MODE_SEL: R8.2 SW1.2 | length 12.6
  Top Layer w0.254: R8.2 181.356,56.007 182.372,57.023 188.055,57.023 SW1.2
NetBT1_1: BT1.1 D1.2 | length 23.3
  Top Layer w0.762: D1.2@155.179,54.369 159.814,59.004 BT1.1@159.814,63.577 ; BT1.1@159.814,64.008 BT1.1@159.814,63.577 ; BT1.1@159.814,72.847 162.433,70.228 162.433,69.105 162.814,68.724 162.814,68.212 162.452,67.849 162.452,66.214 160.03,63.792 BT1.1@159.814,63.577
NetBT2_1: BT2.1 D2.2 | length 17.4
  Top Layer w0.762: D2.2 155.321,63.529 158.007,66.214 158.007,67.849 158.369,68.212 158.369,68.724 157.861,69.232 157.861,70.355 BT2.1@155.369,72.847
NetC8_1: C8.1 R3.1 Y1.3 | length 4.6
  Top Layer w0.254: Y1.3 cw(c106.114,58.159) 106.114,58.242 C8.1 R3.1
NetF1_1: F1.1 J1.1 | length 11
  Top Layer w0.508: J1.1 108.961,89.977 108.961,88.524 109.855,87.63 113.919,87.63 115.939,89.65 115.939,90.749 F1.1
NetK1_1: K1.1 R10.1 | length 2.5
  Top Layer w0.254: K1.1 R10.1@90.64,56.388
NetK2_1: K2.1 R11.1 | length 2
  Top Layer w0.254: K2.1 R11.1@90.043,61.976
NetK3_1: K3.1 R12.1 | length 2.3
  Top Layer w0.381: K3.1 R12.1@90.424,67.564
NetK4_1: K4.1 R13.1 | length 2.3
  Top Layer w0.254: K4.1 R13.1
NetP1_1: P1.1 U2.2 | length 42.1
  Top Layer w0.254: P1.1 68.834,83.058 v1(73.279,78.613) ; v1(85.767,78.536) 85.805,78.574 89.066,78.574 91.821,75.819 103.378,75.819 104.172,75.025 U2.2
  Bottom Layer w0.254: v1(73.279,78.613) 73.345,78.547 73.59,78.547 73.601,78.536 v1(85.767,78.536)
NetP1_2: P1.2 U2.3 | length 43.9
  Top Layer w0.254: P1.2 66.522,85.497 66.522,84.453 73.041,77.934 74.251,77.934 v1(74.295,77.978) ; v1(86.487,78.022) 88.985,78.022 91.567,75.44 103.221,75.44 104.036,74.625 U2.3
  Bottom Layer w0.254: v1@74.301,77.984 86.449,77.984 v1(86.487,78.022)
NetP1_3: P1.3 U2.4 | length 45.9
  Top Layer w0.254: P1.3 64.008,85.725 72.307,77.426 75.178,77.426 v1(75.184,77.432) ; v1(87.249,77.47) 89.001,77.47 91.41,75.061 103.064,75.061 103.9,74.225 U2.4
  Bottom Layer w0.254: v1(75.184,77.432) 75.203,77.451 87.23,77.451 v1(87.249,77.47)
NetP1_4: P1.4 U2.5 | length 48.7
  Top Layer w0.254: P1.4 68.072,78.867 69.977,78.867 72.009,76.835 v1(76.2,76.835) ; v1(88.011,76.918) 88.949,76.918 91.185,74.682 102.864,74.682 103.721,73.825 U2.5
  Bottom Layer w0.254: v1(76.2,76.835) 76.241,76.876 87.969,76.876 v1(88.011,76.918)
NetR5_2: R5.2 S1.1 | length 6.8
  Top Layer w0.254: S1.1@95.064,94.833 95.064,90.333 95.064,88.413 R5.2
NetR6_1: R6.1 S2.2 | length 6.8
  Top Layer w0.254: R6.1 92.642,88.413 92.642,90.333 S2.2@92.642,94.833
NetR7_1: R7.1 R8.1 U5.2 | length 8.9
  Top Layer w0.254: R7.1@169.219,60.016 U5.2@172.682,56.553 ; U5.2 174.752,56.642 175.354,56.04 176.078,56.04 R8.1
  Top Layer w0.762: R7.1 169.1,60.325 R7.1@169.219,60.206
POWER_SEL: K1.3 K2.3 K3.3 K4.3 P3.2 P4.2 P5.2 P6.2 Q1.2 | length 39.2
  Top Layer w0.762: Q1.2@75.184,82.169 79.502,77.851 P6.2 K4.3 82.109,75.673 82.309,75.673 83.439,74.543 83.439,71.253 82.29,70.104 K3.3 ; P3.2 K1.3 82.109,58.947 82.315,58.947 83.439,60.071 83.439,63.367 82.563,64.243 K2.3@82.29,64.516 ; P4.2 K2.3 K2.3@82.29,64.516 ; P5.2 K3.3 ; K3.3 82.109,70.085 82.315,70.085 83.439,68.961 83.439,65.665 K2.3@82.29,64.516
PULSE_LEN_2MS: SW3.4 U2.35 | length 25.9
  Top Layer w0.254: U2.35 114.503,71.425 116.078,69.85 133.603,69.85 SW3.4
PULSE_LEN_3MS: SW3.3 U2.36 | length 23.8
  Top Layer w0.254: U2.36 114.639,71.825 116.233,70.231 132.207,70.231 134.016,72.04 SW3.3
PULSE_LEN_4MS: SW3.1 U2.37 | length 17.6
  Top Layer w0.254: U2.37 114.775,72.225 116.39,70.61 126.363,70.61 SW3.1
PWM_WAVEFORM: Q1.1 R9.1 TP11.1 U2.16 | length 52.2
  Top Layer w0.254: TP11.1 84.963,86.741 87.122,84.582 87.122,81.013 85.979,79.87 R9.1 85.941,79.883 Q1.1 84.963,78.092 84.963,67.564 87.118,65.409 94.675,65.409 95.691,66.425 103.053,66.425 105.552,68.924 U2.16
PWR_SEL_0.1W: K1.2 U2.18 | length 26.9
  Top Layer w0.254: K1.2 87.89,58.928 86.741,60.077 86.741,62.357 87.63,63.246 93.584,63.246 96.005,65.667 103.427,65.667 106.352,68.592 U2.18
PWR_SEL_0.5W: K2.2 U2.17 | length 20.1
  Top Layer w0.254: K2.2 94.318,64.516 95.848,66.046 103.27,66.046 105.952,68.728 U2.17
PWR_SEL_2W: K3.2 U2.14 | length 23.9
  Top Layer w0.254: K3.2 87.817,69.831 87.611,69.831 86.614,68.834 86.614,67.437 87.884,66.167 94.361,66.167 95.377,67.183 101.074,67.183 104.116,70.225 U2.14
PWR_SEL_5W: K4.2 U2.15 | length 30.8
  Top Layer w0.254: K4.2 87.89,75.692 85.598,73.4 85.598,67.818 87.628,65.788 94.518,65.788 95.534,66.804 101.881,66.804 U2.15
QSPI_SCLK: U2.56 U3.6 | length 12.8
  Top Layer w0.254: U3.6 97.765,82.537 98.311,82.537 101.09,79.758 103.094,79.758 104.983,77.869 106.213,77.869 107.152,76.93 U2.56
QSPI_SD0: U2.57 U3.5 | length 11.8
  Top Layer w0.254: U3.5 98.12,81.407 98.26,81.267 98.26,81.191 100.072,79.379 102.937,79.379 104.826,77.49 106.056,77.49 106.754,76.792 U2.57@106.754,76.075
QSPI_SD1: U2.59 U3.2 | length 22.6
  Top Layer w0.254: U3.2 89.84,83.947 89.321,83.428 89.321,81.036 91.736,78.621 102.623,78.621 104.512,76.732 105.742,76.732 105.952,76.522 U2.59
QSPI_SD2: U2.58 U3.3 | length 19.1
  Top Layer w0.254: U3.3 90.83,82.677 94.507,79 102.78,79 104.669,77.111 105.899,77.111 106.352,76.658 U2.58
QSPI_SD3: U2.55 U3.7 | length 13.8
  Top Layer w0.254: U3.7 98.12,83.947 101.93,80.137 103.251,80.137 105.14,78.248 106.37,78.248 107.552,77.066 U2.55
QSPI_SS: R6.2 TP6.1 U2.60 U3.1 | length 31.9
  Top Layer w0.203: 104.9,76.075 U2.60
  Top Layer w0.254: TP6.1@88.011,91.377 88.011,90.17 90.01,88.171 90.734,88.171 R6.2 90.767,85.357 90.627,85.217 U3.1 89.84,85.217 88.942,84.319 88.942,80.879 91.579,78.242 102.466,78.242 104.633,76.075 104.9,76.075
REP_RATE_0.5S: SW2.1 U2.43 | length 19
  Top Layer w0.254: U2.43 116.789,74.625 123.444,81.28 SW2.1
REP_RATE_1S: SW2.3 U2.42 | length 25.1
  Top Layer w0.254: U2.42 116.925,74.225 122.71,80.01 132.746,80.01 SW2.3
REP_RATE_2S: SW2.4 U2.41 | length 27.3
  Top Layer w0.254: U2.41 117.061,73.825 122.865,79.629 134.365,79.629 SW2.4
RUN: S1.2 TP5.1 U2.26 | length 110
  Top Layer w0.254: TP5.1 98.588,90.333 98.207,90.333 97.214,90.333 97.214,94.983 96.991,95.206 96.841,95.206 96.035,96.012 83.566,96.012 80.391,92.837 80.391,78.747 84.455,74.683 84.455,58.667 88.385,54.737 112.997,54.737 114.974,56.713 114.974,62.318 109.552,67.74 U2.26
SWCLK: J2.1 U2.24 | length 13.1
  Top Layer w0.254: U2.24 108.752,66.889 111.379,64.262 J2.1
SWD: J2.2 U2.25 | length 14
  Top Layer w0.254: U2.25 109.152,67.251 111.76,64.643 111.76,59.69 113.527,57.923 113.527,57.908 113.919,57.516 J2.2
T+: T1.6 TP8.1 | length 3.7
  Top Layer w0.254: TP8.1@34.036,75.565 T1.6
T-: T1.7 TP7.1 | length 3.7
  Top Layer w0.254: TP7.1@34.036,65.405 T1.7
VREG_AVDD: C4.1 R1.2 U2.46 | length 8.1
  Top Layer w0.254: U2.46 111.152,78.767 113.124,80.739 113.787,80.739 R1.2 ; R1.2@113.881,80.518 113.881,80.739 C4.1
VREG_IN: C21.1 C23.1 TP10.1 U4.8 U5.3 | length 59.3
  Top Layer w0.508: U4.8 169.431,95.644 C21.1 ; C21.1@169.595,95.58 C21.1 ; TP10.1 180.2,61.976 176.136,57.912 C23.1 176.111,89.954 170.543,95.522 169.552,95.522 C21.1
  Top Layer w0.762: U5.3 C23.1@175.997,57.912
VREG_LX: L1.2 U2.48 | length 8.5
  Top Layer w0.203: U2.48 110.352,79.491
  Top Layer w0.254: 110.352,79.491 110.352,82.928 111.325,83.901 L1.2
WATER: P2.1 SW1.1 | length 160.3
  Top Layer w0.254: P2.1 43.688,59.182 50.925,51.945 189.517,51.945 SW1.1
XIN: C7.1 U2.21 Y1.1 | length 13.2
  Top Layer w0.254: C7.1 102.108,58.356 103.688,59.936 103.883,59.936 104.281,60.334 Y1.1 104.281,63.318 107.552,66.589 U2.21
XOUT: R3.2 U2.22 | length 6.7
  Top Layer w0.254: R3.2 107.952,62.524 U2.22
pads on no net: J1.4 S3.8A S3.8B SW1.5 SW1.6 SW2.5 SW2.6 SW3.5 SW3.6 U2.7 U2.8 U2.9 U2.10 U2.12 U2.13 U2.19 U2.40 U4.5
copper on no net:
  other v3: 50.673,70.485

## Polygon pours and split planes (outlines as drawn)
3V3 on Top Layer "T.3V3-3" (solid, remove dead copper, pour order 8): 114.554,81.28 cw(c113.03,81.28) 113.03,79.756 106.934,79.756 cw(c106.934,81.635) 105.055,81.635 105.055,81.669 105.055,82.558 ccw(c102.909,82.558) 104.426,84.076 103.767,84.735 ccw(c101.971,82.939) 101.971,85.479 99.467,85.479 cw(c99.467,86.241) 98.705,86.241 98.705,86.622 ccw(c98.197,86.622) 98.197,87.13 95.911,87.13 ccw(c95.911,85.86) 94.641,85.86 94.641,77.089 cw(c92.355,77.089) 92.355,74.803 91.948,74.803 ccw(c91.948,73.914) 91.059,73.914 91.059,54.999 ccw(c93.599,54.999) 93.599,52.459 123.317,52.459 137.668,52.451 140.589,52.451 ccw(c140.589,54.864) 143.002,54.864 143.002,82.677 ccw(c141.605,82.677) 141.605,84.074 cw(c141.605,85.602) 140.077,85.602 140.077,89.448 ccw(c139.194,89.535) 140.081,89.535 140.081,92.202 ccw(c139.7,92.202) 139.7,92.583 136.906,92.583 ccw(c136.906,92.075) 136.398,92.075 136.398,91.948 cw(c136.017,91.948) 136.017,91.567 133.495,91.567 cw(c133.495,91.948) 133.114,91.948 133.114,94.852 ccw(c132.834,94.852) 132.834,95.131 130.97,95.131 ccw(c130.974,94.893) 130.736,94.889 130.736,92.18 cw(c130.385,92.18) 130.385,91.829 119.406,91.829 ccw(c119.406,90.432) 118.009,90.432 118.009,88.527 cw(c116.612,88.527) 116.612,87.13 116.459,87.13 ccw(c116.459,85.225) 114.554,85.225
3V3 on Top Layer "T.3V3-1" (solid, pour order 1): 113.157,67.776 103.432,67.776 103.432,77.301 113.157,77.301
5V on Top Layer "T.5V-2" (solid, pour order 14): 118.543,95.776 cw(c118.797,95.776) 118.797,96.03 118.813,96.022 121.606,96.022 121.606,94.243 118.813,94.243 cw(c118.813,94.497) 118.559,94.497 118.543,94.506
5V on Top Layer "T.5V" (solid, pour order 7): 133.731,94.869 133.522,94.869 cw(c133.522,95.173) 133.218,95.173 ccw(c132.969,95.123) 132.969,95.377 130.937,95.377 ccw(c130.937,95.03) 130.59,95.03 130.59,93.218 130.59,92.389 cw(c130.153,92.395) 130.147,91.958 cw(c130.048,92.456) 130.048,91.948 114.046,91.948 cw(c114.046,92.583) 113.411,92.583 113.411,96.012 cw(c114.3,96.012) 114.3,96.901 157.988,96.901 cw(c157.988,94.996) 159.893,94.996 cw(c158.369,94.996) 158.369,93.472 148.59,93.472 ccw(c148.59,91.059) 146.177,91.059 cw(c144.653,91.059) 144.653,89.535 141.478,89.535 cw(c141.478,90.678) 140.335,90.678 140.335,90.932 140.335,92.329 ccw(c139.7,92.329) 139.7,92.964 137.287,92.964 cw(c137.287,94.099) 136.152,94.099 136.144,94.408 136.144,94.488 ccw(c135.763,94.488) 135.763,94.869
GND on Top Layer "T.GND-1" (solid, pour order 0): 109.067,55.902 cw(c108.466,55.846) 108.522,55.245 108.395,55.245 101.664,55.245 cw(c101.663,55.88) 101.029,55.88 101.029,56.156 101.028,62.887 cw(c101.56,62.887) 101.56,63.418 101.577,63.445 108.395,63.445 cw(c108.395,62.788) 109.052,62.788 109.067,62.651
3V3 on Top Layer "T.3V3-2" (solid, pour order 11): 133.985,88.457 ccw(c133.786,88.457) 133.786,88.656 129.423,88.656 ccw(c129.423,88.519) 129.286,88.519 129.286,86.34 ccw(c129.478,86.34) 129.478,86.148 133.786,86.148 ccw(c133.786,86.347) 133.985,86.347 133.985,86.487
3V3 on Top Layer "T.3V3-2" (solid, pour order 10): 118.543,90.061 cw(c118.797,90.061) 118.797,90.315 118.813,90.307 121.606,90.307 121.606,88.528 118.813,88.528 cw(c118.813,88.782) 118.559,88.782 118.543,88.791
3V3 on Top Layer "T.3V3-2" (solid, pour order 9): 132.715,95.25 cw(c132.715,94.922) 133.043,94.922 133.043,91.521 ccw(c133.118,91.521) 133.118,91.445 ccw(c133.206,91.524) 133.2,91.406 132.194,91.406 ccw(c132.194,91.373) 132.16,91.373 130.653,91.373 ccw(c130.653,91.445) 130.725,91.445 130.725,95.038 cw(c130.937,95.038) 130.937,95.25 131.906,95.25
GND on Top Layer "T.GND-2" (solid, pour order 6): 135.636,94.789 cw(c135.636,94.408) 136.017,94.408 136.017,92.075 cw(c135.636,92.075) 135.636,91.694 133.546,91.694 cw(c133.547,92.063) 133.178,92.065 133.178,94.361 cw(c133.596,94.361) 133.596,94.779 133.606,94.789
GND on Top Layer "T.GND-2" (solid, pour order 4): 126.746,88.773 cw(c126.492,88.773) 126.492,88.519 122.869,88.519 122.869,90.298 126.492,90.298 cw(c126.492,90.044) 126.746,90.044
GND on Top Layer "T.GND-2" (solid, pour order 3): 126.746,94.488 cw(c126.492,94.488) 126.492,94.234 122.869,94.234 122.869,96.012 126.492,96.012 cw(c126.492,95.758) 126.746,95.758
1V1 on Top Layer "T.1V1-1" (solid, pour order 2): 106.172,74.844 110.572,74.844 110.572,70.444 106.172,70.444
GND on Bottom Layer "B.GND" (solid, pour order 13): 33.067,51.591 cw(c35.324,53.848) 32.133,53.848 32.133,96.139 cw(c32.258,96.139) 32.192,96.246 cw(c35.324,95.631) 33.067,97.888 33.068,97.888 33.303,98.123 33.303,98.124 cw(c35.56,95.867) 35.402,99.054 35.433,99.058 35.562,99.058 212.217,99.058 cw(c212.217,95.867) 214.474,98.124 214.71,97.888 cw(c212.453,95.631) 215.644,95.631 215.644,95.63 215.644,53.975 cw(c212.453,53.975) 214.71,51.718 213.966,50.974 cw(c211.709,53.231) 211.709,50.04 35.941,50.04 cw(c35.941,53.231) 33.684,50.974
EARTH on Bottom Layer "B.EARTH" (solid, pour order 12): 101.346,94.742 cw(c101.346,93.599) 102.489,93.599 102.489,92.71 ccw(c104.267,92.71) 104.267,90.932 110.236,90.932 ccw(c110.236,92.075) 111.379,92.075 111.379,93.98 cw(c112.141,93.98) 112.141,94.742 205.232,94.742 cw(c205.232,92.202) 207.772,92.202 207.772,54.102 cw(c205.232,54.102) 205.232,51.562 44.069,51.562 cw(c44.069,53.467) 42.164,53.467 42.164,56.388 ccw(c40.386,56.388) 40.386,58.166 32.512,58.166 ccw(c32.512,57.785) 32.131,57.785 32.131,52.705 ccw(c34.671,52.705) 34.671,50.165 212.979,50.165 ccw(c212.979,52.705) 215.519,52.705 215.519,96.356 ccw(c212.979,96.356) 212.979,98.896 35.089,98.896 cw(c34.962,98.896) 34.962,98.769 ccw(c34.962,96.229) 32.422,96.229 32.422,89.318 cw(c32.258,89.318) 32.258,89.154 39.878,89.154 ccw(c39.878,90.043) 40.767,90.043 40.767,92.202 cw(c43.307,92.202) 43.307,94.742

## Keep-outs
Keep-Out Layer:
  lines w0.25: 32.258,95.631 cw(c35.324,95.631) 33.156,97.799 33.392,98.035 cw(c35.56,95.867) 35.56,98.933 ; 32.258,96.139 32.258,53.848 ccw(c35.324,53.848) 33.156,51.68 33.773,51.063 ccw(c35.941,53.231) 35.941,50.165 211.709,50.165 ccw(c211.709,53.231) 213.877,51.063 214.621,51.807 ccw(c212.453,53.975) 215.519,53.975 215.519,95.631 ccw(c212.453,95.631) 214.621,97.799 214.385,98.035 ccw(c212.217,95.867) 212.217,98.933 35.433,98.933

## Silkscreen, mask and mechanical layers (free items; w line width, h text height)
Top Overlay:
  drawing of 53 lines, arcs and shapes, not listed
  text "5V" at 137.617,96.469 h0.64
  text "3V3" at 137.363,92.405 h0.64
  text "Underwater Acoustic Pinger" at 48.514,92.16 h1.02
  text "Machine Intelligence Lab" at 48.514,90.128 h1.02
  text "RUN" at 99.263,89.23 h0.64
  text "GND" at 81.229,88.976 h0.64
  text "PWM" at 84.15,88.976 h0.64
  text "BOOT" at 86.817,88.976 h0.64
  text "GND" at 137.363,88.341 h0.64
  text "GPIO" at 60.274,87.579 h0.64
  text "+5V      GND" at 142.189,86.182 h0.64
  text "1V1" at 112.471,83.642 h0.64
  text "Joseph Goodman / Aiden Shepler" at 41.021,83.312 h1.14
  text "3   2   1   0" at 60.833,83.058 h0.64
  text "-" at 154.94,80.264 h1.02
  text "< REP RATE  / [L] 0.5 s / [M] 1 s / [R] 2 s" at 141.859,77.089 h0.64
  text "5W" at 76.657,74.244 h0.64
  text "+" at 34.29,72.856 h1.02
  text "2W" at 76.657,68.529 h0.64
  text "< PULSE LEN / [L] 4 ms / [M] 3 ms / [R] 2 ms" at 141.859,68.072 h0.64
  text "-" at 34.29,67.056 h1.02
  text "9V" at 188.036,63.83 h0.64